# Altium PCB V11_Board.PcbDoc (part 2 of 2)
Units mil, origin at the board's own origin, x right, y up, seen from the top; angles counter-clockwise.
Board outline 6000 x 4000 mil, 2 copper layers (Top Layer, Bottom Layer); 168 components, 105 nets, 506 pads, 0 vias.
Unrouted connection lines stored in the file: 378.
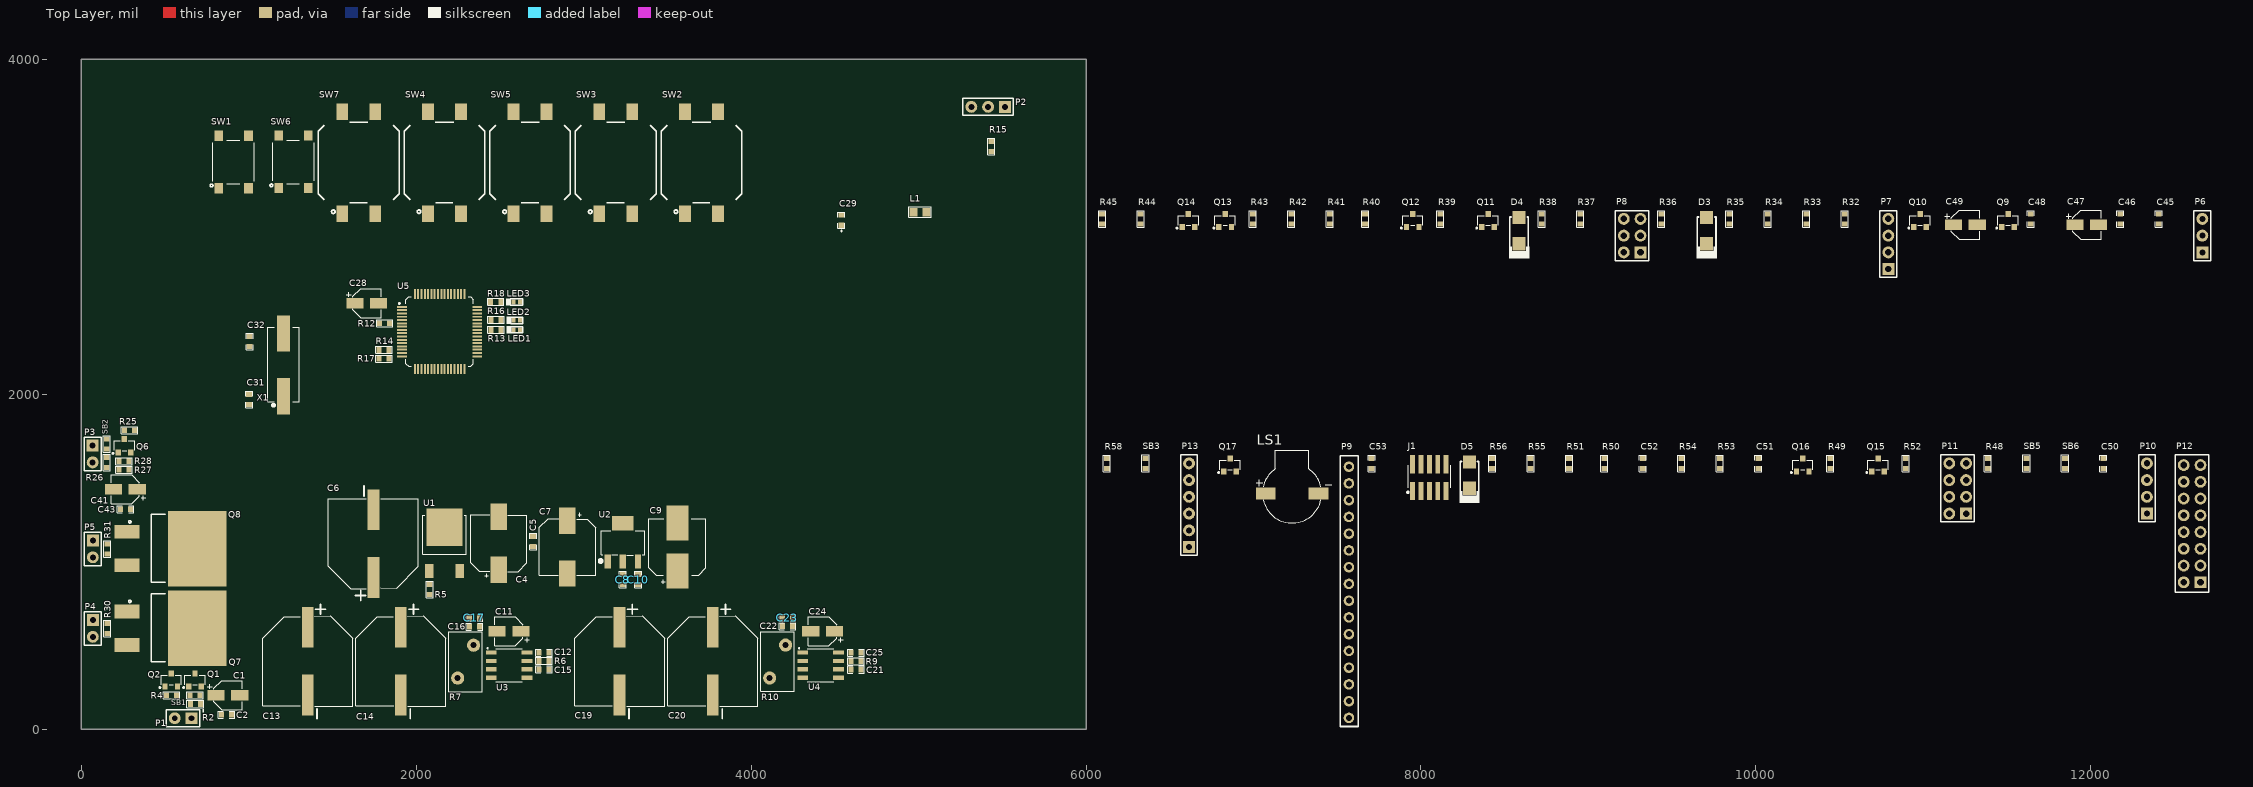
[diagram p0: Top Layer view]

## Part data (continued)
Q2 Q5 Q9 Q10 Q12 Q13 Q14 Q15 Q17: "TRANS NPN 160V 0.6A SOT-23", Case/Package=SOT-23-3, Collector Base Voltage (VCBO)=180V, Collector Emitter Breakdown Voltage=160V, Collector Emitter Saturation Voltage=150mV, Collector-emitter Voltage-Max=200mV, Current Rating=600mA, Emitter Base Voltage (VEBO)=6V, MANUFACTURER="ON Semiconductor", Manufacturer Part Number=MMBT5551LT1G, Max Operating Temperature=150°C, Max Power Dissipation=225mW, Min Operating Temperature=-55°C, Package Quantity=1, Power Dissipation=300mW, Supplier Part Number 1=MMBT5551LT1GOSDKR-ND, Category=BJTs, Collector Emitter Voltage (VCEO)=160V, ComponentLink1Description=https://datasheet.ciiva.com/976/mmbt5550lt1-d-976512.pdf?src-supplier=Digi-Key, ComponentLink1URL=https://datasheet.ciiva.com/976/mmbt5550lt1-d-976512.pdf?src-supplier=Digi-Key, ComponentLink2Description=https://datasheet.ciiva.com/34303/2011387-34303825.pdf?src-supplier=Jameco, ComponentLink2URL=https://datasheet.ciiva.com/34303/2011387-34303825.pdf?src-supplier=Jameco, ComponentLink3Description=https://datasheet.ciiva.com/15139/getdatasheetpartid-92641-15139178.pdf?src-supplier=Verical, ComponentLink3URL=https://datasheet.ciiva.com/15139/getdatasheetpartid-92641-15139178.pdf?src-supplier=Verical, ComponentLink4Description=https://datasheet.ciiva.com/16984/0900766b8078eb1b-16984971.pdf?src-supplier=Allied+Electronics, ComponentLink4URL=https://datasheet.ciiva.com/16984/0900766b8078eb1b-16984971.pdf?src-supplier=Allied+Electronics, ComponentLink5Description=https://datasheet.ciiva.com/976/mmbt5550lt1-d-976513.pdf?src-supplier=Digi-Key, ComponentLink5URL=https://datasheet.ciiva.com/976/mmbt5550lt1-d-976513.pdf?src-supplier=Digi-Key, ComponentLink6Description=https://datasheet.ciiva.com/4722/mmbt5550lt1-d-111393-4722711.pdf?src-supplier=Mouser, ComponentLink6URL=https://datasheet.ciiva.com/4722/mmbt5550lt1-d-111393-4722711.pdf?src-supplier=Mouser, ComponentLink7Description=https://datasheet.ciiva.com/16478/mmbt5550lt1-d-16478568.pdf?src-supplier=Avnet+Asia, ComponentLink7URL=https://datasheet.ciiva.com/16478/mmbt5550lt1-d-16478568.pdf?src-supplier=Avnet+Asia, ComponentLink8Description=https://datasheet.ciiva.com/7972/mmbt5550lt1-d-7972073.pdf?src-supplier=Element14, ComponentLink8URL=https://datasheet.ciiva.com/7972/mmbt5550lt1-d-7972073.pdf?src-supplier=Element14, ComponentLink9Description=https://datasheet.ciiva.com/25997/mmbt5550lt1-d-25997449.pdf?src-supplier=Avnet+Europe, ComponentLink9URL=https://datasheet.ciiva.com/25997/mmbt5550lt1-d-25997449.pdf?src-supplier=Avnet+Europe, ComponentLink10Description=https://datasheet.ciiva.com/7972/mmbt5550lt1-d-7972075.pdf?src-supplier=Element14, ComponentLink10URL=https://datasheet.ciiva.com/7972/mmbt5550lt1-d-7972075.pdf?src-supplier=Element14, ComponentLink11Description=https://datasheet.ciiva.com/11197/mmbt5550lt1-d-11197404.pdf?src-supplier=Avnet, ComponentLink11URL=https://datasheet.ciiva.com/11197/mmbt5550lt1-d-11197404.pdf?src-supplier=Avnet, ComponentLink12Description=https://datasheet.ciiva.com/976/mmbt5550lt1-d-976511.pdf?src-supplier=Digi-Key, ComponentLink12URL=https://datasheet.ciiva.com/976/mmbt5550lt1-d-976511.pdf?src-supplier=Digi-Key, ComponentLink13Description=https://datasheet.ciiva.com/16342/mmbt5550lt1-d-16342687.pdf?src-supplier=Future+Electronics, ComponentLink13URL=https://datasheet.ciiva.com/16342/mmbt5550lt1-d-16342687.pdf?src-supplier=Future+Electronics, Contact Plating=Tin,Matte, Element Configuration=Single, Height=0.94mm, hFE Min=80, Lead Free="Lead Free", Length=2.9mm, Max Breakdown Voltage=160V, Max Collector Current=600mA, Number of Elements=1, Number of Pins=3, Packaging="Tape and Reel", Polarity=NPN, Pricing 1="1=0.22000, 10=0.17700, 100=0.09370, 500=0.06162, 1000=0.04190 (USD)", Radiation Hardening=No, REACH SVHC="No SVHC", RoHS=Yes, RoHS Compliant=Yes, Series=-, Supplier 1=Digi-Key, Voltage Rating (DC)=160V, Weight=0.01lb, Width=1.3mm
Q3 Q6 Q16: "MOSFET N-CH 20V 4.2A SOT23", Case/Package=SOT-23, Continuous Drain Current (ID)=4.2A, Drain to Source Breakdown Voltage=20V, Drain to Source Resistance=45mR, Gate to Source Voltage (Vgs)=12V, Input Capacitance=740pF, MANUFACTURER="International Rectifier", Max Operating Temperature=150°C, Max Power Dissipation=1.25W, Min Operating Temperature=-55°C, Package Quantity=3000, Supplier Part Number 1=11X6741, Threshold Voltage=1.2V, Category=MOSFETs, ComponentLink1Description=https://datasheet.ciiva.com/36526/1563649-36526014.pdf?src-supplier=Jameco, ComponentLink1URL=https://datasheet.ciiva.com/36526/1563649-36526014.pdf?src-supplier=Jameco, ComponentLink2Description=https://datasheet.ciiva.com/16425/irlml2502pbf-16425943.pdf?src-supplier=Future+Electronics, ComponentLink2URL=https://datasheet.ciiva.com/16425/irlml2502pbf-16425943.pdf?src-supplier=Future+Electronics, ComponentLink3Description=https://datasheet.ciiva.com/6156/irlml2502-6156070.pdf?src-supplier=Farnell, ComponentLink3URL=https://datasheet.ciiva.com/6156/irlml2502-6156070.pdf?src-supplier=Farnell, ComponentLink4Description=https://datasheet.ciiva.com/7935/irlml2502-7935685.pdf?src-supplier=Element14, ComponentLink4URL=https://datasheet.ciiva.com/7935/irlml2502-7935685.pdf?src-supplier=Element14, Current Rating=4.2A, Drain to Source Voltage (Vdss)=20V, Drain-source On Resistance-Max=45mR, Dual Supply Voltage=20V, Element Configuration=Single, Fall Time=26ns, Height=1.02mm, Lead Free="Lead Free", Length=2.8mm, Manufacturer Part Number=IRLML2502TRPBF, Mount="Surface Mount", Nominal Vgs=1.2V, Number of Elements=1, Number of Pins=3, On-State Resistance=45mR, Packaging="Tape and Reel", Power Dissipation=1.25W, Radiation Hardening=No, Rds On Max=45mR, REACH SVHC="No SVHC", Rise Time=10ns, RoHS=Yes, Supplier 1=Newark, Termination=SMD/SMT, Turn-Off Delay Time=54ns, Turn-On Delay Time=7.5ns, Voltage Rating (DC)=20V, Width=1.4mm
Q7 Q8: "MOSFET N-CH 55V 110A D2PAK", Case/Package=D2PAK, Continuous Drain Current (ID)=110A, Drain to Source Breakdown Voltage=55V, Drain to Source Resistance=8mR, Gate to Source Voltage (Vgs)=20V, Input Capacitance=3.247nF, MANUFACTURER=Infineon, Max Operating Temperature=175°C, Max Power Dissipation=200W, Min Operating Temperature=-55°C, Supplier Part Number 1=IRF3205STRLPBFDKR-ND, Threshold Voltage=4V, Category=MOSFETs, ComponentLink1Description=http://www.farnell.com/datasheets/1884183.pdf?src-supplier=Element14, ComponentLink1URL=http://www.farnell.com/datasheets/1884183.pdf?src-supplier=Element14, Drain to Source Voltage (Vdss)=55V, Halogen Free="Halogen Free", Height=0.19inch, Lead Free="Contains Lead", Length=0.42inch, Manufacturer Part Number=IRF3205STRLPBF, Max Dual Supply Voltage=55V, Mount="Surface Mount", Number of Pins=3, Packaging="Cut Tape", Power Dissipation=200W, Pricing 1="1=1.87000, 10=1.67900, 100=1.34960 (USD)", Rds On Max=8mR, REACH SVHC="No SVHC", RoHS=Yes, Supplier 1=Digi-Key, Turn-Off Delay Time=50ns, Turn-On Delay Time=14ns, Width=0.38inch
R1 R3 R25 R27 R29 R39 R43 R55 R56: library part RC0603FR-071KL, "RES SMD 1K OHM 1% 1/10W 0603", Case Code (Imperial)=0603, Case Code (Metric)=1608, MANUFACTURER=Yageo, Max Operating Temperature=155°C, Min Operating Temperature=-55°C, Power Rating=100mW, Resistance=1kR, Supplier Part Number 1=311-1.00KHRDKR-ND, Temperature Coefficient=100ppm/°C, Tolerance=1%, Voltage Rating=50V, Case/Package=0603, ComponentLink1Description=https://www.verical.com/server-webapp/html/getDatasheet?partID=409289&src-supplier=Verical, ComponentLink1URL=https://www.verical.com/server-webapp/html/getDatasheet?partID=409289&src-supplier=Verical, ComponentLink2Description=http://documents.rs-components.com/techlib://itc_doclist_GB.htm?stockno=5048928&src-supplier=RSComponents, ComponentLink2URL=http://documents.rs-components.com/techlib://itc_doclist_GB.htm?stockno=5048928&src-supplier=RSComponents, ComponentLink3Description=http://www.yageo.com/documents/recent/PYu-RC0603_51_RoHS_L_4.pdf?src-supplier=Avnet+Europe, ComponentLink3URL=http://www.yageo.com/documents/recent/PYu-RC0603_51_RoHS_L_4.pdf?src-supplier=Avnet+Europe, ComponentLink4Description=http://www.farnell.com/datasheets/2167052.pdf?src-supplier=Element14, ComponentLink4URL=http://www.farnell.com/datasheets/2167052.pdf?src-supplier=Element14, ComponentLink5Description=http://www.farnell.com/datasheets/1868787.pdf?src-supplier=Element14, ComponentLink5URL=http://www.farnell.com/datasheets/1868787.pdf?src-supplier=Element14, ComponentLink6Description=http://www.yageo.com/documents/recent/PYu-RC_Group_51_RoHS_L_2.pdf?src-supplier=Avnet, ComponentLink6URL=http://www.yageo.com/documents/recent/PYu-RC_Group_51_RoHS_L_2.pdf?src-supplier=Avnet, ComponentLink7Description=https://www.verical.com/server-webapp/html/getDatasheet?partID=404327&src-supplier=Verical, ComponentLink7URL=https://www.verical.com/server-webapp/html/getDatasheet?partID=404327&src-supplier=Verical, ComponentLink8Description=http://www.farnell.com/datasheets/443971.pdf?src-supplier=Element14, ComponentLink8URL=http://www.farnell.com/datasheets/443971.pdf?src-supplier=Element14, Composition="Thick Film", Contact Plating=Tin,Matte, Depth=0.8mm, Height=0.45mm, Lead Free="Lead Free", Length=1.6mm, Manufacturer Part Number=RC0603FR-071KL, Military Standard=Not, Packaging="Tape and Reel", Pricing 1="1=0.1, 10=0.023, 100=0.0094, 1000=0.0042, 2500=0.0037 (USD)", Radiation Hardening=No, REACH SVHC="No SVHC", Stock 1=21472395, Supplier 1=Digi-Key, Termination=SMD/SMT
R2 R4 R26 R28 R32 R34 R41 R42 R48 R49 R51: library part AC0603JR-0710KL, "RES SMD 10K OHM 5% 1/10W 0603", Case Code (Imperial)=0603, Case Code (Metric)=1608, MANUFACTURER=Yageo, Max Operating Temperature=155°C, Max Power Dissipation=100mW, Min Operating Temperature=-55°C, Package Quantity=1, Resistance=10kR, Resistor Type="Thick Film", Supplier Part Number 1=1029044, Temperature Coefficient=100ppm/°C, Tolerance=5%, Voltage Rating=50V, Case/Package=0603, Category="Chip SMD Resistors", ComponentLink1Description=https://datasheet.ciiva.com/5562/pyu-ac-51-rohs-l-2-5562553.pdf?src-supplier=Mouser, ComponentLink1URL=https://datasheet.ciiva.com/5562/pyu-ac-51-rohs-l-2-5562553.pdf?src-supplier=Mouser, Construction=Rectangular, Depth=0.8mm, Features="Moisture Resistant,Automotive AEC-Q200,Anti-Sulfur", Height=0.022inch, Lead Free="Lead Free", Length=0.063inch, Manufacturer Part Number=AC0603JR-0710KL, Military Standard=Not, Number of Terminations=2, Packaging="Tape and Reel", Power Rating=100mW, Pricing 1="5000=0.00540 (USD)", RoHS=Yes, RoHS Compliant=Yes, Series=AC, Size Code=0603, Stock 1=1533000, Supplier 1="Future Electronics", Termination=SMD/SMT, Width=0.031inch
R5: library part RC0603FR-0733RL, "RES SMD 0603 33 Ohm 1% 1/10W", Case Code (Imperial)=0603, Case Code (Metric)=1608, MANUFACTURER=Yageo, Max Operating Temperature=155°C, Max Power Dissipation=100mW, Min Operating Temperature=-55°C, Package Quantity=1, Resistance Tolerance=1%, Resistor Type="Thick Film", Supplier Part Number 1=311-33.0HRCT-ND, Temperature Coefficient=100ppm/°C, Voltage Rating=75V, Voltage Rating (DC)=50V, Case/Package=0603, Category="Chip SMD Resistors", ComponentLink1Description=https://datasheet.ciiva.com/11808/0900766b80f96399-11808741.pdf?src-supplier=RSComponents, ComponentLink1URL=https://datasheet.ciiva.com/11808/0900766b80f96399-11808741.pdf?src-supplier=RSComponents, ComponentLink2Description=https://datasheet.ciiva.com/2453/pyu-r-int-thick-7-2453952.pdf?src-supplier=Digi-Key, ComponentLink2URL=https://datasheet.ciiva.com/2453/pyu-r-int-thick-7-2453952.pdf?src-supplier=Digi-Key, ComponentLink3Description=https://datasheet.ciiva.com/2453/pyu-r-int-thick-7-2453953.pdf?src-supplier=Digi-Key, ComponentLink3URL=https://datasheet.ciiva.com/2453/pyu-r-int-thick-7-2453953.pdf?src-supplier=Digi-Key, ComponentLink4Description=https://datasheet.ciiva.com/2453/pyu-r-int-thick-7-2453954.pdf?src-supplier=Digi-Key, ComponentLink4URL=https://datasheet.ciiva.com/2453/pyu-r-int-thick-7-2453954.pdf?src-supplier=Digi-Key, ComponentLink5Description=https://datasheet.ciiva.com/7660/38590-7660792.pdf?src-supplier=Element14, ComponentLink5URL=https://datasheet.ciiva.com/7660/38590-7660792.pdf?src-supplier=Element14, ComponentLink6Description=https://datasheet.ciiva.com/15189/getdatasheetpartid-326673-15189708.pdf?src-supplier=Verical, ComponentLink6URL=https://datasheet.ciiva.com/15189/getdatasheetpartid-326673-15189708.pdf?src-supplier=Verical, ComponentLink7Description=https://datasheet.ciiva.com/7746/443971-7746334.pdf?src-supplier=Element14, ComponentLink7URL=https://datasheet.ciiva.com/7746/443971-7746334.pdf?src-supplier=Element14, ComponentLink8Description=https://datasheet.ciiva.com/7746/443971-7746335.pdf?src-supplier=Element14, ComponentLink8URL=https://datasheet.ciiva.com/7746/443971-7746335.pdf?src-supplier=Element14, ComponentLink9Description=https://datasheet.ciiva.com/46395/443971-46395007.pdf?src-supplier=Element14, ComponentLink9URL=https://datasheet.ciiva.com/46395/443971-46395007.pdf?src-supplier=Element14, Construction=Rectangular, Depth=0.8mm, Features="Moisture Resistant", Height=0.45mm, Lead Free="Lead Free", Lead Pitch=0.3mm, Length=1.6mm, Manufacturer Part Number=RC0603FR-0733RL, Military Standard=Not, Number of Pins=2, Number of Terminations=2, Packaging="Tape and Reel", Power Rating=100mW, Pricing 1="1=0.10000, 10=0.02400, 100=0.00970, 1000=0.00436, 2500=0.00378 (USD)", REACH SVHC="No SVHC", Resistance=33R, RoHS=Yes, RoHS Compliant=Yes, Series=RC, Size Code=0603, Stock 1=41, Supplier 1=Digi-Key, Technology="THICK FILM", Termination=SMD/SMT, Tolerance=1%, Weight=7.1E-05oz, Width=0.8mm
R6 R9 R15 R19 R20 R21 R22 R23 R50: library part RC0603FR-072K2L, "RES SMD 2.2K OHM 1% 1/10W 0603", Case/Package=0603, MANUFACTURER="Yageo Phycomp", Max Operating Temperature=155°C, Min Operating Temperature=-55°C, Power Rating=100mW, Resistance=2.2kR, Supplier Part Number 1=311-2.20KHRCT-ND, Temperature Coefficient=100ppm/°C, Tolerance=1%, Voltage Rating (DC)=50V, Depth=0.8mm, Height=0.45mm, Lead Free="Lead Free", Length=1.6mm, Manufacturer Part Number=RC0603FR-072K2L, Mount="Surface Mount", Number of Pins=2, Packaging="Cut Tape", Pricing 1="1=0.1, 10=0.023, 100=0.0094, 1000=0.00421, 2500=0.00366 (USD)", REACH SVHC="No SVHC", Stock 1=10587920, Supplier 1=Digi-Key, Width=800um
R7 R10: "VARISTOR 22V 250A DISC 7MM", Capacitance=2.3nF, Case/Package=Radial, Clamping Current=2.5A, Clamping Voltage=43V, MANUFACTURER=Bourns, Max Operating Temperature=85°C, Max Surge Current=250A, Max Varistor Voltage=24V, Max Voltage Rating (AC)=14V, Max Voltage Rating (DC)=18V, Min Operating Temperature=-40°C, Min Varistor Voltage=20V, Package Quantity=2000, Supplier Part Number 1=MOV-07D220K-ND, Tolerance=10%, Varistor Voltage=22V, Category=Varistors, ComponentLink1Description=https://datasheet.ciiva.com/30093/mov07d-30093751.pdf?src-supplier=Onlinecomponents.com, ComponentLink1URL=https://datasheet.ciiva.com/30093/mov07d-30093751.pdf?src-supplier=Onlinecomponents.com, ComponentLink2Description=https://datasheet.ciiva.com/369/mov07d-369225.pdf?src-supplier=Digi-Key, ComponentLink2URL=https://datasheet.ciiva.com/369/mov07d-369225.pdf?src-supplier=Digi-Key, ComponentLink3Description=https://datasheet.ciiva.com/3026/mov07d-3026223.pdf?src-supplier=Avnet, ComponentLink3URL=https://datasheet.ciiva.com/3026/mov07d-3026223.pdf?src-supplier=Avnet, Diameter=7mm, Energy=1.1J, Lead Pitch=5mm, Lead/Base Style=Radial, Manufacturer Part Number=MOV-07D220K, Mount="Through Hole,Radial", Number of Circuits=1, Packaging=Bulk, Pricing 1="1=0.43000, 10=0.30800, 25=0.23920, 100=0.18130, 250=0.12824, 500=0.10260, 1000=0.07866, 2500=0.06840, 5000=0.06156 (USD)", Radiation Hardening=No, RoHS=Yes, RoHS Compliant=Yes, Series=-, Stock 1=292, Supplier 1=Digi-Key, Voltage Rating (DC)=24V, Width=6.8mm
R8 R11: library part AC0603JR-07470KL, "RES SMD 470K OHM 5% 1/10W 0603", Case Code (Imperial)=0603, Case Code (Metric)=1608, MANUFACTURER=Yageo, Max Operating Temperature=155°C, Max Power Dissipation=100mW, Min Operating Temperature=-55°C, Resistance=470kR, Resistor Type="Thick Film", Supplier Part Number 1=YAG3672DKR-ND, Temperature Coefficient=100ppm/°C, Tolerance=5%, Voltage Rating=50V, Case/Package=0603, ComponentLink1Description=https://datasheet.ciiva.com/11820/0900766b80808d64-11820639.pdf?src-supplier=RSComponents, ComponentLink1URL=https://datasheet.ciiva.com/11820/0900766b80808d64-11820639.pdf?src-supplier=RSComponents, ComponentLink2Description=https://datasheet.ciiva.com/2487/rr-data-sheet-2487286.pdf?src-supplier=Digi-Key, ComponentLink2URL=https://datasheet.ciiva.com/2487/rr-data-sheet-2487286.pdf?src-supplier=Digi-Key, ComponentLink3Description=https://datasheet.ciiva.com/7984/87330-7984374.pdf?src-supplier=Element14, ComponentLink3URL=https://datasheet.ciiva.com/7984/87330-7984374.pdf?src-supplier=Element14, ComponentLink4Description=https://datasheet.ciiva.com/2487/rr-data-sheet-2487287.pdf?src-supplier=Digi-Key, ComponentLink4URL=https://datasheet.ciiva.com/2487/rr-data-sheet-2487287.pdf?src-supplier=Digi-Key, ComponentLink5Description=https://datasheet.ciiva.com/2487/rr-data-sheet-2487288.pdf?src-supplier=Digi-Key, ComponentLink5URL=https://datasheet.ciiva.com/2487/rr-data-sheet-2487288.pdf?src-supplier=Digi-Key, ComponentLink6Description=https://datasheet.ciiva.com/5759/87330-5759049.pdf?src-supplier=Farnell, ComponentLink6URL=https://datasheet.ciiva.com/5759/87330-5759049.pdf?src-supplier=Farnell, ComponentLink7Description=http://www.mouser.com/ds/2/447/yageodocoutput-1111992.pdf?src-supplier=Mouser, ComponentLink7URL=http://www.mouser.com/ds/2/447/yageodocoutput-1111992.pdf?src-supplier=Mouser, Features="Moisture Resistant,Automotive AEC-Q200", Height=0.022inch, Length=0.063inch, Manufacturer Part Number=AC0603JR-07470KL, Number of Terminations=2, Packaging="Tape and Reel", Power Rating=100mW, Pricing 1="1=0.1, 10=0.024, 100=0.0097, 1000=0.0044, 2500=0.0038 (USD)", RoHS Compliant=Yes, Series=AC, Stock 1=71, Supplier 1=Digi-Key, Termination=SMD/SMT, Weight=7.1E-05oz, Width=0.8mm
R12: library part RC0603JR-07390RL, "RES SMD 390 OHM 5% 1/10W 0603", Case Code (Imperial)=0603, Case Code (Metric)=1608, MANUFACTURER=Yageo, Max Operating Temperature=155°C, Max Power Dissipation=100mW, Min Operating Temperature=-55°C, Package Quantity=1, Supplier Part Number 1=311-390GRCT-ND, Temperature Coefficient=100ppm/°C, Tolerance=5%, Voltage Rating=50V, Working Voltage=75V, Case/Package=0603, ComponentLink1Description=http://www.yageo.com.tw/exep/pages/download/literatures/PYu-R_INT-thick_7.pdf?src-supplier=Digi-Key, ComponentLink1URL=http://www.yageo.com.tw/exep/pages/download/literatures/PYu-R_INT-thick_7.pdf?src-supplier=Digi-Key, ComponentLink2Description=http://www.yageo.com/documents/recent/PYu-RC_Group_51_RoHS_L_10.pdf?src-supplier=Digi-Key, ComponentLink2URL=http://www.yageo.com/documents/recent/PYu-RC_Group_51_RoHS_L_10.pdf?src-supplier=Digi-Key, ComponentLink3Description=http://www.yageo.com/documents/recent/PYu-RC_Group_51_RoHS_L_9.pdf?src-supplier=Digi-Key, ComponentLink3URL=http://www.yageo.com/documents/recent/PYu-RC_Group_51_RoHS_L_9.pdf?src-supplier=Digi-Key, ComponentLink4Description=http://www.farnell.com/datasheets/443971.pdf?src-supplier=Element14, ComponentLink4URL=http://www.farnell.com/datasheets/443971.pdf?src-supplier=Element14, Composition="Thick Film", Depth=0.8mm, Features="Moisture Resistant", Height=0.022inch, Lead Free="Lead Free", Length=1.6mm, Manufacturer Part Number=RC0603JR-07390RL, Military Standard=Not, Number of Pins=2, Number of Terminations=2, Packaging="Tape and Reel", Power Rating=100mW, Pricing 1="1=0.1, 10=0.02, 100=0.0081, 1000=0.00362, 2500=0.00314 (USD)", REACH SVHC="No SVHC", Resistance=390R, Stock 1=1598874, Supplier 1=Digi-Key, Termination=SMD/SMT, Voltage Rating (DC)=50V, Width=0.8mm
R13 R16 R18: library part RC0603FR-07680RL, "RES SMD 680 OHM 1% 1/10W 0603", Case Code (Imperial)=0603, Case Code (Metric)=1608, MANUFACTURER=Yageo, Max Operating Temperature=155°C, Max Power Dissipation=100mW, Min Operating Temperature=-55°C, Package Quantity=1, Supplier Part Number 1=311-680HRCT-ND, Temperature Coefficient=100ppm/°C, Tolerance=1%, Voltage Rating=50V, Case/Package=0603, ComponentLink1Description=http://www.farnell.com/datasheets/1868787.pdf?src-supplier=Element14, ComponentLink1URL=http://www.farnell.com/datasheets/1868787.pdf?src-supplier=Element14, ComponentLink2Description=http://documents.rs-components.com/techlib://itc_doclist_GB.htm?stockno=5048221&src-supplier=RSComponents, ComponentLink2URL=http://documents.rs-components.com/techlib://itc_doclist_GB.htm?stockno=5048221&src-supplier=RSComponents, ComponentLink3Description=http://www.farnell.com/datasheets/443971.pdf?src-supplier=Element14, ComponentLink3URL=http://www.farnell.com/datasheets/443971.pdf?src-supplier=Element14, ComponentLink4Description=http://www.yageo.com/documents/recent/PYu-RC_Group_51_RoHS_L_10.pdf?src-supplier=Digi-Key, ComponentLink4URL=http://www.yageo.com/documents/recent/PYu-RC_Group_51_RoHS_L_10.pdf?src-supplier=Digi-Key, Composition="Thick Film", Depth=0.8mm, Features="Moisture Resistant", Height=0.022inch, Lead Free="Lead Free", Length=1.6mm, Manufacturer Part Number=RC0603FR-07680RL, Military Standard=Not, Number of Pins=2, Number of Terminations=2, Packaging="Tape and Reel", Power Rating=100mW, Pricing 1="1=0.1, 10=0.024, 100=0.0097, 1000=0.00437, 2500=0.00379 (USD)", REACH SVHC="No SVHC", Resistance=680R, Stock 1=4278227, Supplier 1=Digi-Key, Termination=SMD/SMT, Voltage Rating (DC)=50V, Width=0.031inch
R14: library part CRCW06036K80JNEA, "RES SMD 6.8K OHM 5% 1/10W 0603", Case Code (Imperial)=0603, Case Code (Metric)=1608, MANUFACTURER="Vishay Dale", Max Operating Temperature=155°C, Max Power Dissipation=100mW, Min Operating Temperature=-55°C, Package Quantity=1, Resistance=6.8kR, Resistance Tolerance=5%, Resistor Type="Thick Film", Supplier Part Number 1=541-6.8KGCT-ND, Temperature Coefficient=200ppm/°C, Voltage Rating=75V, Case/Package=0603, Category="Chip SMD Resistors", ComponentLink1Description=https://datasheet.ciiva.com/2493/dcrcwe3-2493715.pdf?src-supplier=Digi-Key, ComponentLink1URL=https://datasheet.ciiva.com/2493/dcrcwe3-2493715.pdf?src-supplier=Digi-Key, ComponentLink2Description=https://datasheet.ciiva.com/2493/dcrcwe3-2493716.pdf?src-supplier=Digi-Key, ComponentLink2URL=https://datasheet.ciiva.com/2493/dcrcwe3-2493716.pdf?src-supplier=Digi-Key, ComponentLink3Description=https://datasheet.ciiva.com/2493/dcrcwe3-2493717.pdf?src-supplier=Digi-Key, ComponentLink3URL=https://datasheet.ciiva.com/2493/dcrcwe3-2493717.pdf?src-supplier=Digi-Key, ComponentLink4Description=https://datasheet.ciiva.com/28542/1747939-28542618.pdf?src-supplier=Element14, ComponentLink4URL=https://datasheet.ciiva.com/28542/1747939-28542618.pdf?src-supplier=Element14, ComponentLink5Description=https://datasheet.ciiva.com/3257/dcrcwe3-3257854.pdf?src-supplier=Avnet, ComponentLink5URL=https://datasheet.ciiva.com/3257/dcrcwe3-3257854.pdf?src-supplier=Avnet, Construction=Rectangular, Contact Plating=Tin, Depth=0.85mm, Features="Automotive AEC-Q200", Height=0.45mm, Lead Free="Lead Free", Length=1.55mm, Manufacturer Part Number=CRCW06036K80JNEA, Military Standard=Not, Number of Terminations=2, Packaging="Tape and Reel", Power Rating=100mW, Pricing 1="1=0.10000, 10=0.03300, 100=0.01360, 1000=0.00610, 2500=0.00529 (USD)", Radiation Hardening=No, REACH SVHC=Unknown, RoHS=Yes, RoHS Compliant=Yes, Series=CRCW, Size Code=0603, Stock 1=38850, Supplier 1=Digi-Key, Technology="THICK FILM", Termination=SMD/SMT, Tolerance=5%, Voltage Rating (DC)=75V, Weight=7.1E-05oz, Width=0.85mm
R17: library part RC0603FR-073K3L, "RES SMD 3.3K OHM 1% 1/10W 0603", Case/Package=0603, MANUFACTURER="Yageo Phycomp", Max Operating Temperature=155°C, Min Operating Temperature=-55°C, Power Rating=100mW, Resistance=3.3kR, Supplier Part Number 1=311-3.30KHRCT-ND, Temperature Coefficient=100ppm/°C, Tolerance=1%, Voltage Rating (DC)=50V, Depth=0.8mm, Height=0.45mm, Lead Free="Lead Free", Length=1.6mm, Manufacturer Part Number=RC0603FR-073K3L, Mount="Surface Mount", Number of Pins=2, Packaging="Cut Tape", Pricing 1="1=0.1, 10=0.024, 100=0.0097, 1000=0.00437, 2500=0.00379 (USD)", REACH SVHC="No SVHC", Stock 1=6863000, Supplier 1=Digi-Key, Width=800um
R24 R33 R36: library part RC0603JR-07330RL, "RES SMD 330 OHM 5% 1/10W 0603"
R30 R31: library part RC0603FR-0747RL, "RES SMD 47OHM 0.1W 0603", Case Code (Imperial)=0603, Case Code (Metric)=1608, MANUFACTURER=Yageo, Max Operating Temperature=155°C, Max Power Dissipation=100mW, Min Operating Temperature=-55°C, Package Quantity=1, Resistance Tolerance=1%, Resistor Type="Thick Film", Supplier Part Number 1=311-47.0HRCT-ND, Temperature Coefficient=100ppm/°C, Voltage Rating=75V, Voltage Rating (DC)=50V, Case/Package=0603, Category="Chip SMD Resistors", ComponentLink1Description=https://datasheet.ciiva.com/2453/pyu-r-int-thick-7-2453922.pdf?src-supplier=Digi-Key, ComponentLink1URL=https://datasheet.ciiva.com/2453/pyu-r-int-thick-7-2453922.pdf?src-supplier=Digi-Key, ComponentLink2Description=https://datasheet.ciiva.com/2453/pyu-r-int-thick-7-2453923.pdf?src-supplier=Digi-Key, ComponentLink2URL=https://datasheet.ciiva.com/2453/pyu-r-int-thick-7-2453923.pdf?src-supplier=Digi-Key, ComponentLink3Description=https://datasheet.ciiva.com/2453/pyu-r-int-thick-7-2453924.pdf?src-supplier=Digi-Key, ComponentLink3URL=https://datasheet.ciiva.com/2453/pyu-r-int-thick-7-2453924.pdf?src-supplier=Digi-Key, ComponentLink4Description=https://datasheet.ciiva.com/7746/443971-7746363.pdf?src-supplier=Element14, ComponentLink4URL=https://datasheet.ciiva.com/7746/443971-7746363.pdf?src-supplier=Element14, ComponentLink5Description=https://datasheet.ciiva.com/7746/443971-7746364.pdf?src-supplier=Element14, ComponentLink5URL=https://datasheet.ciiva.com/7746/443971-7746364.pdf?src-supplier=Element14, ComponentLink6Description=https://datasheet.ciiva.com/46440/1868787-46440908.pdf?src-supplier=Element14, ComponentLink6URL=https://datasheet.ciiva.com/46440/1868787-46440908.pdf?src-supplier=Element14, Construction=Rectangular, Depth=0.8mm, Features="Moisture Resistant", Height=0.022inch, Lead Free="Lead Free", Length=1.6mm, Manufacturer Part Number=RC0603FR-0747RL, Military Standard=Not, Number of Pins=2, Number of Terminations=2, Packaging="Tape and Reel", Power Rating=100mW, Pricing 1="1=0.10000, 10=0.02400, 100=0.00970, 1000=0.00436, 2500=0.00378 (USD)", REACH SVHC=Unknown, Resistance=47R, RoHS=Yes, RoHS Compliant=Yes, Series=RC, Size Code=0603, Stock 1=596562, Supplier 1=Digi-Key, Termination=SMD/SMT, Tolerance=1%, Weight=7.1E-05oz, Width=0.8mm
R35 R40: library part RC0603FR-071K5L, "RES SMD 1.5K OHM 1% 1/10W 0603"
R37 R38 R52: library part RC0603FR-070RL, "RES SMD 0R, 1%, 0.1W, 0603", Case Code (Imperial)=0603, Case Code (Metric)=1608, Current Rating=1A, MANUFACTURER=Yageo, Max Operating Temperature=155°C, Max Power Dissipation=100mW, Min Operating Temperature=-55°C, Package Quantity=5000, Resistance=0mR, Resistor Type="Thick Film", Temperature Coefficient=200ppm/°C, Tolerance=1%, Voltage Rating=50V, Working Voltage=75V, Case/Package=0603, Category="Chip SMD Resistors", ComponentLink1Description=https://datasheet.ciiva.com/11808/0900766b80f96399-11808172.pdf?src-supplier=RSComponents, ComponentLink1URL=https://datasheet.ciiva.com/11808/0900766b80f96399-11808172.pdf?src-supplier=RSComponents, ComponentLink2Description=https://datasheet.ciiva.com/5558/rc0603-272842-5558341.pdf?src-supplier=Mouser, ComponentLink2URL=https://datasheet.ciiva.com/5558/rc0603-272842-5558341.pdf?src-supplier=Mouser, ComponentLink3Description=https://datasheet.ciiva.com/46382/443971-46382072.pdf?src-supplier=Element14, ComponentLink3URL=https://datasheet.ciiva.com/46382/443971-46382072.pdf?src-supplier=Element14, ComponentLink4Description=https://datasheet.ciiva.com/29721/pyu-r-int-thick-7-29721178.pdf?src-supplier=Digi-Key, ComponentLink4URL=https://datasheet.ciiva.com/29721/pyu-r-int-thick-7-29721178.pdf?src-supplier=Digi-Key, ComponentLink5Description=https://datasheet.ciiva.com/5684/443971-5684699.pdf?src-supplier=Farnell, ComponentLink5URL=https://datasheet.ciiva.com/5684/443971-5684699.pdf?src-supplier=Farnell, ComponentLink6Description=https://datasheet.ciiva.com/7983/443971-7983627.pdf?src-supplier=Element14, ComponentLink6URL=https://datasheet.ciiva.com/7983/443971-7983627.pdf?src-supplier=Element14, ComponentLink7Description=https://datasheet.ciiva.com/29721/pyu-rc0603-51-rohs-l-4-29721179.pdf?src-supplier=Digi-Key, ComponentLink7URL=https://datasheet.ciiva.com/29721/pyu-rc0603-51-rohs-l-4-29721179.pdf?src-supplier=Digi-Key, ComponentLink8Description=https://datasheet.ciiva.com/22643/1868787-22643388.pdf?src-supplier=Element14, ComponentLink8URL=https://datasheet.ciiva.com/22643/1868787-22643388.pdf?src-supplier=Element14, Contact Plating=Tin,Matte, Depth=0.8mm, Features="Moisture Resistant", Height=0.45mm, Lead Free="Lead Free", Length=1.6mm, Manufacturer Part Number=RC0603FR-070RL, Military Standard=Not, Number of Pins=2, Number of Terminations=2, Packaging="Tape and Reel", Power Rating=100mW, Pricing 1="5000=0.00320, 5000=0.00490, 50000=0.00450, 500000=0.00250, 2500000=0.00150 (USD)", Radiation Hardening=No, REACH SVHC="No SVHC", RoHS=Yes, Stock 1=1270000, Supplier 1="Arrow Electronics", Supplier Part Number 1=RC0603FR-070RL, Termination=SMD/SMT, Voltage Rating (DC)=50V, Width=0.031inch
R44 R45 R53 R54 R58: library part RC0603FR-074K7L, "RES SMD 4.7K OHM 1% 1/10W 0603", Case Code (Imperial)=0603, Case Code (Metric)=1608, MANUFACTURER=Yageo, Max Operating Temperature=155°C, Max Power Dissipation=100mW, Min Operating Temperature=-55°C, Resistance=4.7kR, Resistance Tolerance=1%, Resistor Type="Thick Film", Supplier Part Number 1=311-4.70KHRCT-ND, Temperature Coefficient=100ppm/°C, Voltage Rating=50V, Case/Package=0603, Category="Chip SMD Resistors", ComponentLink1Description=https://datasheet.ciiva.com/15189/getdatasheetpartid-422754-15189760.pdf?src-supplier=Verical, ComponentLink1URL=https://datasheet.ciiva.com/15189/getdatasheetpartid-422754-15189760.pdf?src-supplier=Verical, ComponentLink2Description=https://datasheet.ciiva.com/22747/443971-22747528.pdf?src-supplier=Element14, ComponentLink2URL=https://datasheet.ciiva.com/22747/443971-22747528.pdf?src-supplier=Element14, ComponentLink3Description=https://datasheet.ciiva.com/7660/38590-7660794.pdf?src-supplier=Element14, ComponentLink3URL=https://datasheet.ciiva.com/7660/38590-7660794.pdf?src-supplier=Element14, ComponentLink4Description=https://datasheet.ciiva.com/7746/1868787-7746365.pdf?src-supplier=Element14, ComponentLink4URL=https://datasheet.ciiva.com/7746/1868787-7746365.pdf?src-supplier=Element14, ComponentLink5Description=https://datasheet.ciiva.com/46440/1868787-46440909.pdf?src-supplier=Element14, ComponentLink5URL=https://datasheet.ciiva.com/46440/1868787-46440909.pdf?src-supplier=Element14, ComponentLink6Description=https://datasheet.ciiva.com/7746/1738695-7746366.pdf?src-supplier=Element14, ComponentLink6URL=https://datasheet.ciiva.com/7746/1738695-7746366.pdf?src-supplier=Element14, Construction=Rectangular, Depth=0.8mm, Features="Moisture Resistant", Height=0.45mm, Lead Free="Lead Free", Lead Pitch=0.3mm, Length=1.6mm, Manufacturer Part Number=RC0603FR-074K7L, Military Standard=Not, Number of Pins=2, Number of Terminations=2, Packaging="Tape and Reel", Power Rating=100mW, Pricing 1="1=0.10000, 10=0.02400, 100=0.00970, 1000=0.00436, 2500=0.00378 (USD)", REACH SVHC="No SVHC", RoHS=Yes, RoHS Compliant=Yes, Series=RC, Size Code=0603, Stock 1=1924316, Supplier 1=Digi-Key, Termination=SMD/SMT, Tolerance=1%, Voltage Rating (DC)=50V, Width=0.8mm
SB1 SB2 SB3 SB5 SB6: "Solder Bridge ON"
SW1 SW6: "SWITCH TACTILE SPST-NO 0.05A 12V", Case/Package=SMD/SMT, Color=Black, Contact Resistance=100mR, Current Rating=50mA, MANUFACTURER="ITT C&K", Max Operating Temperature=60°C, Max Voltage Rating (DC)=12V, Min Operating Temperature=-20°C, Operating Force=160gf, Package Quantity=1, Supplier Part Number 1=CKN9112CT-ND, Actuator Length=0.85mm, Actuator Material=Nylon,Polyamide,PA66, Actuator Type=Standard, Category="Tactile Switches", ComponentLink1Description=https://datasheet.ciiva.com/29903/getdatasheetpartid-786341-29903846.pdf?src-supplier=Verical, ComponentLink1URL=https://datasheet.ciiva.com/29903/getdatasheetpartid-786341-29903846.pdf?src-supplier=Verical, ComponentLink2Description=https://datasheet.ciiva.com/29931/getdatasheetpartid-764615-29931183.pdf?src-supplier=Verical, ComponentLink2URL=https://datasheet.ciiva.com/29931/getdatasheetpartid-764615-29931183.pdf?src-supplier=Verical, ComponentLink3Description=https://datasheet.ciiva.com/14920/pts645-14920733.pdf?src-supplier=Digi-Key, ComponentLink3URL=https://datasheet.ciiva.com/14920/pts645-14920733.pdf?src-supplier=Digi-Key, ComponentLink4Description=https://datasheet.ciiva.com/14920/pts645-14920734.pdf?src-supplier=Digi-Key, ComponentLink4URL=https://datasheet.ciiva.com/14920/pts645-14920734.pdf?src-supplier=Digi-Key, ComponentLink5Description=https://datasheet.ciiva.com/14920/pts645-14920735.pdf?src-supplier=Digi-Key, ComponentLink5URL=https://datasheet.ciiva.com/14920/pts645-14920735.pdf?src-supplier=Digi-Key, Contact Material=Silver, Contact Plating=Silver, Depth=9mm, Illumination Type=Non-Illuminated,Illuminated, Lead Free="Lead Free", Length=6mm, Manufacturer Part Number=PTS645SM43SMTR92LFS, Max Current Rating=50mA, Mechanical Life=100000Cycles, Mount="Surface Mount", Orientation=Straight, Packaging="Tape and Reel", Pricing 1="1=0.26000, 10=0.25100, 25=0.23840, 100=0.21580, 250=0.19676, 500=0.18288 (USD)", REACH SVHC="No SVHC", RoHS=Yes, RoHS Compliant=Yes, Series=PTS645, Size=6mm, Stock 1=1002899, Supplier 1=Digi-Key, Switch Function=Off-Mom, Termination="Gull Wing", Throw Configuration=SPST, Voltage Rating (DC)=12V
SW2 SW3 SW4 SW5 SW7: library part TL3300CF160Q, "SWITCH TACTILE SPST-NO 0.05A 12V", Case/Package=SMD/SMT, Contact Resistance=100mR, Current Rating=50mA, MANUFACTURER=E-Switch, Max Operating Temperature=70°C, Max Voltage Rating (DC)=12V, Min Operating Temperature=-25°C, Operating Force=160gf, Package Quantity=1, Supplier Part Number 1=612-TL3300CF160Q, Actuator Length=5mm, Actuator Type=Standard, ComponentLink1Description=http://www.e-switch.com/system/asset/product_line/data_sheet/157/TL3300.pdf?src-supplier=Digi-Key, ComponentLink1URL=http://www.e-switch.com/system/asset/product_line/data_sheet/157/TL3300.pdf?src-supplier=Digi-Key, ComponentLink2Description=http://spec_sheets.e-switch.com/specs/N301102.pdf?src-supplier=Digi-Key, ComponentLink2URL=http://spec_sheets.e-switch.com/specs/N301102.pdf?src-supplier=Digi-Key, Contact Plating=Silver, Electrical Life=200000Cycles, Illumination Type=Non-Illuminated, Lead Free="Lead Free", Manufacturer Part Number=TL3300CF160Q, Mechanical Life=200000Cycles, Mount="Surface Mount", Orientation=Straight, Packaging="Tape and Reel", Pricing 1="1=0.53, 10=0.513, 50=0.43, 100=0.393, 1000=0.293, 10000=0.274 (USD)", RoHS Compliant=Yes, Series=TL3300, Stock 1=1884, Supplier 1=Mouser, Switch Function=Off-Mom, Switch Travel=0.35mm, Termination="Gull Wing", Throw Configuration=SPST, Voltage Rating (DC)=12V
U1: "IC REG LINEAR 5V 500MA TO252-3", Case/Package=TO-252, Current Rating=500mA, Dropout Voltage=1.8V, MANUFACTURER="TI National Semiconductor", Max Input Voltage=35V, Max Operating Temperature=125°C, Min Input Voltage=7.2V, Min Operating Temperature=-40°C, Output Voltage=5V, Package Quantity=75, Power Supply Rejection Ratio (PSRR)=78dB, Quiescent Current=10mA, Supplier Part Number 1=LM78M05CDT-ND, Category="Voltage Regulators - Linear", ComponentLink1Description=https://datasheet.ciiva.com/26906/lm78m05cdt-26906263.pdf?src-supplier=IIIC, ComponentLink1URL=https://datasheet.ciiva.com/26906/lm78m05cdt-26906263.pdf?src-supplier=IIIC, ComponentLink2Description=https://datasheet.ciiva.com/6584/lm341-6584030.pdf?src-supplier=Digi-Key, ComponentLink2URL=https://datasheet.ciiva.com/6584/lm341-6584030.pdf?src-supplier=Digi-Key, Height=2.3mm, Lead Free="Contains Lead", Length=6.58mm, Manufacturer Part Number=LM78M05CDT, Max Output Current=500mA, Mount="Surface Mount", Number of Outputs=1, Number of Pins=3, Number of Regulators=1, Output Current=500mA, Output Type=Fixed, Packaging=Rail/Tube, Polarity=Positive, Pricing 1="1=2.68000, 10=2.40700, 25=2.27120, 100=1.93490, 250=1.81684, 500=1.58974, 1000=1.49975 (USD)", Radiation Hardening=No, RoHS=No, RoHS Compliant=No, Series=-, Stock 1=815, Supplier 1=Digi-Key, Width=6.1mm
U2: "IC REG LINEAR 3.3V 1A SOT223", Case/Package=SOT-223, Current Rating=1A, Dropout Voltage=1.2V, MANUFACTURER="Texas Instruments", Max Input Voltage=15V, Max Operating Temperature=125°C, Min Input Voltage=2.5V, Min Operating Temperature=0°C, Nominal Output Voltage=3.3V, Nominal Supply Current=5mA, Output Voltage Accuracy=1%, Package Quantity=1000, Quiescent Current=10mA, Accuracy=1%, Category="Voltage Regulators - Linear", ComponentLink1Description=https://datasheet.ciiva.com/3225/lms8117a-3225472.pdf?src-supplier=Avnet, ComponentLink1URL=https://datasheet.ciiva.com/3225/lms8117a-3225472.pdf?src-supplier=Avnet, ComponentLink2Description=https://datasheet.ciiva.com/2066/lms8117a-2066594.pdf?src-supplier=Digi-Key, ComponentLink2URL=https://datasheet.ciiva.com/2066/lms8117a-2066594.pdf?src-supplier=Digi-Key, ComponentLink3Description=https://datasheet.ciiva.com/2066/lms8117a-2066595.pdf?src-supplier=Digi-Key, ComponentLink3URL=https://datasheet.ciiva.com/2066/lms8117a-2066595.pdf?src-supplier=Digi-Key, ComponentLink4Description=https://datasheet.ciiva.com/2066/lms8117a-2066596.pdf?src-supplier=Digi-Key, ComponentLink4URL=https://datasheet.ciiva.com/2066/lms8117a-2066596.pdf?src-supplier=Digi-Key, ComponentLink5Description=https://datasheet.ciiva.com/3223/lms8117a-3223813.pdf?src-supplier=Avnet, ComponentLink5URL=https://datasheet.ciiva.com/3223/lms8117a-3223813.pdf?src-supplier=Avnet, ComponentLink6Description=https://datasheet.ciiva.com/25979/lms8117a-25979141.pdf?src-supplier=Avnet+Europe, ComponentLink6URL=https://datasheet.ciiva.com/25979/lms8117a-25979141.pdf?src-supplier=Avnet+Europe, ComponentLink7Description=https://datasheet.ciiva.com/46386/1558097-46386039.pdf?src-supplier=Element14, ComponentLink7URL=https://datasheet.ciiva.com/46386/1558097-46386039.pdf?src-supplier=Element14, ComponentLink8Description=https://datasheet.ciiva.com/8042/90386-8042363.pdf?src-supplier=Element14, ComponentLink8URL=https://datasheet.ciiva.com/8042/90386-8042363.pdf?src-supplier=Element14, ComponentLink9Description=https://datasheet.ciiva.com/5697/1558097-5697692.pdf?src-supplier=Farnell, ComponentLink9URL=https://datasheet.ciiva.com/5697/1558097-5697692.pdf?src-supplier=Farnell, Contact Plating=Tin,Matte, Height=1.6mm, Lead Free="Lead Free", Length=6.5mm, Manufacturer Part Number=LMS8117AMP-3.3/NOPB, Max Output Current=1A, Mount="Surface Mount", Number of Outputs=1, Number of Pins=4, Output Current=1A, Output Type=Fixed, Output Voltage=3.3V, Packaging="Tape and Reel", Polarity=Positive, Pricing 1="1=1.18760, 10=1.01800, 100=0.77540, 250=0.68460, 500=0.64870, 1000=0.59270 (USD)", Radiation Hardening=No, REACH SVHC="No SVHC", RoHS=Yes, RoHS Compliant=Yes, Stock 1=843, Supplier 1="Arrow Electronics", Supplier Part Number 1=LMS8117AMP-3.3/NOPB, Width=3.56mm
U3 U4: "SENSOR CURRENT HALL 20A DC", Case/Package=SOIC, Current Sensing=20A, Frequency=80kHz, MANUFACTURER="Allegro MicroSystems", Max Operating Temperature=150°C, Max Supply Current=14mA, Min Operating Temperature=-40°C, Supplier Part Number 1=620-1645-1-ND, Accuracy=3%, Category="Current Sensors", ComponentLink1Description=http://www.farnell.com/datasheets/2838158.pdf?src-supplier=Farnell, ComponentLink1URL=http://www.farnell.com/datasheets/2838158.pdf?src-supplier=Farnell, ComponentLink2Description=http://www.farnell.com/datasheets/2838158.pdf?src-supplier=Newark, ComponentLink2URL=http://www.farnell.com/datasheets/2838158.pdf?src-supplier=Newark, ComponentLink3Description=http://www.allegromicro.com/~/media/Files/Datasheets/ACS723-Datasheet.ashx?src-supplier=Digi-Key, ComponentLink3URL=http://www.allegromicro.com/~/media/Files/Datasheets/ACS723-Datasheet.ashx?src-supplier=Digi-Key, ComponentLink4Description=https://www.allegromicro.com/~/media/Files/Datasheets/ACS723-Datasheet.ashx?src-supplier=Digi-Key, ComponentLink4URL=https://www.allegromicro.com/~/media/Files/Datasheets/ACS723-Datasheet.ashx?src-supplier=Digi-Key, Linearity=1%, Manufacturer Part Number=ACS723LLCTR-20AU-T, Mount="Surface Mount", Number of Channels=1, Number of Pins=8, Packaging="Tape and Reel", Polarity=Unidirectional, Pricing 1="1=4.46000, 5=3.94000, 10=3.47900, 25=2.82280, 50=2.49480, 100=2.42900, 500=2.03516, 1000=1.90385 (USD)", Response Time=5us, RoHS=Yes, RoHS Compliant=Yes, Sensitivity=200mV/A, Supplier 1=Digi-Key
U5: "IC MCU 32BIT 64KB FLASH 64LQFP", Case/Package=LQFP, Frequency=48MHz, MANUFACTURER=STMicroelectronics, Max Operating Temperature=85°C, Max Power Dissipation=455mW, Max Supply Voltage=3.6V, Min Operating Temperature=-40°C, Min Supply Voltage=2V, Supplier Part Number 1=497-17361-ND, Category=Microcontrollers, ComponentLink1Description=https://datasheet.ciiva.com/48492/dm00090510-48492508.pdf?src-supplier=Avnet, ComponentLink1URL=https://datasheet.ciiva.com/48492/dm00090510-48492508.pdf?src-supplier=Avnet, Contact Plating=Tin,Matte, Core Architecture=ARM, Data Bus Width=32b, Interface=I2C,SPI,USB,CAN,HDMI,IrDA,UART,USART,LIN,I2S, Lead Free="Lead Free", Manufacturer Part Number=STM32F072R8T6, Max Frequency=48MHz, Memory Size=64KB, Memory Type=FLASH, Mount="Surface Mount", Number of I/Os=51, Number of Pins=64, Number of Programmable I/O=51, Number of Timers/Counters=9, Oscillator Type=Internal, Packaging=Tray, Peripherals=POR,PWM,WDT,DMA, Pricing 1="1=5.28000, 10=4.73900, 25=4.48040, 160=3.88300, 320=3.68388, 480=3.31879 (USD)", RAM Size=16KB, RoHS=Yes, RoHS Compliant=Yes, Supplier 1=Digi-Key, Watchdog Timer=Yes
U6: "IC GATE DRVR LOW-SIDE 8SOIC", Case/Package=SOIC, MANUFACTURER="ON Semiconductor", Max Operating Temperature=140°C, Max Output Current=5A, Max Supply Current=3mA, Max Supply Voltage=20V, Min Operating Temperature=-40°C, Min Supply Voltage=4.5V, Supplier Part Number 1=NCP81071ADR2GOSDKR-ND, Category="Gate Drivers", Channel Type=Independent, ComponentLink1Description=https://datasheet.ciiva.com/48511/ncp81071-d-48511319.pdf?src-supplier=Avnet, ComponentLink1URL=https://datasheet.ciiva.com/48511/ncp81071-d-48511319.pdf?src-supplier=Avnet, Height=1.5mm, Lead Free="Lead Free", Length=5mm, Manufacturer Part Number=NCP81071ADR2G, Mount="Surface Mount", Number of Drivers=2, Number of Outputs=2, Number of Pins=8, Packaging="Cut Tape", Pricing 1="1=1.40000, 10=1.25100, 25=1.18720, 100=0.97520, 250=0.91160, 500=0.80560, 1000=0.70000 (USD)", REACH SVHC="No SVHC", RoHS=Yes, RoHS Compliant=Yes, Supplier 1=Digi-Key, Width=4mm
X1: "CRYSTAL 8.0000MHZ 18PF SMD"

## Nets (pads, with @x,y where several pads share a name; then routed paths per layer and width w, separated by ;. In a path a pad name is that pad's centre, name@x,y a point inside that pad or via, vN(x,y) a via of type N, cw(c..) or ccw(c..) an arc to the next point about the centre after c; other vN are vias at no path point)
3V3: C7.1 C8.1 C27.1 C28.1 C50.1 C51.1 C52.1 J1.1 L1.1 LED1.1 LED2.1 LED3.1 P2.1 P11.2 R19.2 R20.2 R21.2 R22.2 R23.2 R24.2 R49.2 U2.2 U2.4 U5.1 U5.19 U5.32 U5.48 U5.64
5V: C4.1 C5.1 C11.1 C12.1 C24.1 C25.1 C45.1 C46.1 C47.1 C48.1 C49.1 D3.1 LS1.1 P6.1 P8.5 P12.2 Q11.2 R34.2 R35.2 R40.2 R41.2 R42.2 R48.2 R52.2 R53.1 SB5.1 U1.3 U3.8 U4.8
_ADC: C34.1 R14.2 R17.2 U5.14
BASE: Q9.1 Q10.3 R34.1
BAT: C3.2 P1.1 Q1.3 Q3.3 R1.1 SB1.2
BOOT0: R15.1 U5.60
CRNT_SNS.IP+_1: C13.1 C14.1 C16.1 C17.1 P4.1 R7.2 U3.1 U3.2
CRNT_SNS.IP+_2: C19.1 C20.1 C22.1 C23.1 P5.1 R10.2 U4.1 U4.2
DIV: P12.3 R53.2 R54.2
DRV_OUTA1: R30.2 U6.7
DRV_OUTB1: R31.2 U6.5
ENA: P9.13 R29.1 U5.53 U6.1 U6.8
GATE_DRV.INA_1: U5.16 U6.2
GATE_DRV.INB_1: U5.15 U6.4
GND: C1.2 C2.2 C3.1 C4.2 C5.2 C6.2 C7.2 C8.2 C9.2 C10.2 C11.2 C12.2 C13.2 C14.2 C15.2 C16.2 C17.2 C18.2 C19.2 C20.2 C21.2 C22.2 C23.2 C24.2 C25.2 C26.2 C27.2 C28.2 C29.2 C30.2 C31.1 C32.1 C33.2 C34.2 C35.1 C36.1 C37.1 C38.1 C39.1 C40.1 C41.2 C42.1 C43.2 C44.2 C45.2 C46.2 C47.2 C48.2 C49.2 C50.2 C51.2 C52.2 C53.2 D1.2 D2.2 D3.2 D4.2 D5.2 J1.3 J1.5 J1.9 P1.2 P2.3 P3.2 P6.3 P8.1 P10.4 P11.1 P12.1 P12.5 P12.7 P12.8 P12.9 P12.10 P13.6 Q2.2 Q3.2 Q5.2 Q6.2 Q7.2 Q8.2 Q9.2 Q10.2 Q12.2 Q13.2 Q14.2 Q15.2 Q16.2 Q17.2 R1.2 R7.1 R8.1 R10.1 R11.1 R17.1 R25.2 R29.2 R37.1 R39.2 R51.1 R54.1 R56.2 SW1.1 SW2.1 SW3.1 SW4.1 SW5.1 SW6.1 SW7.1 U1.2 U2.1 U3.5 U4.5 U5.12 U5.18 U5.31 U5.47 U5.63 U6.3
GND_DRV_1: P4.2 Q7.3
GND_DRV_2: P5.2 Q8.3
HEATER: C42.2 P3.1 Q4.3 Q6.3 R25.1 SB2.2
IO_A3: R55.2 U5.17
IO_A8: R13.1 SB3.1 U5.41
IO_A9: P7.4 R33.1 U5.42
IO_A10: P7.3 R32.1 U5.43
IO_A11: R16.1 U5.44
IO_A12: R18.1 U5.45
IO_B7: R4.1 U5.59
IO_B7#: Q2.1 Q3.1 R4.2
IO_B9: R38.1 U5.62
IO_B10: P12.4 U5.29
IO_B11: P12.6 U5.30
IO_B12: P12.11 U5.33
IO_B13: P12.12 U5.34
IO_B14: P12.13 U5.35
IO_B15: P12.14 U5.36
IO_C0: P9.1 U5.8
IO_C1: P9.2 U5.9
IO_C2: P9.3 U5.10
IO_C3: P9.4 U5.11
IO_C4: P9.5 R45.1 U5.24
IO_C5: P9.6 R36.2 U5.25
IO_C5#: D4.1 P8.3 Q12.3 R36.1 R40.1
IO_C6: P9.7 U5.37
IO_C7: P9.8 U5.38
IO_C8: P9.9 U5.39
IO_C9: P9.10 R28.1 U5.40
IO_C9#: Q5.1 Q6.1 R28.2
IO_C13: P9.14 R44.1 U5.2
MISO: P11.5 U5.22
MOSI: P11.3 U5.23
NetC15_1: C15.1 U3.6
NetC21_1: C21.1 U4.6
NetC32_2: C32.2 R12.2 X1.2
NetLED1_2: LED1.2 R13.2
NetLED2_2: LED2.2 R16.2
NetLED3_2: LED3.2 R18.2
NetLS1_2: LS1.2 Q17.3
NetP2_2: P2.2 R15.2
NetP8_4: P8.4 R37.2
NetP8_6: P8.6 R38.2
NetP10_1: P10.1 SB6.2
NetP10_2: P10.2 R48.1
NetP12_15: P12.15 R52.1
NetQ1_1: Q1.1 R2.1 R3.1
NetQ2_3: Q2.3 R3.2
NetQ4_1: Q4.1 R26.1 R27.1
NetQ5_3: Q5.3 R27.2
NetQ7_1: Q7.1 R30.1
NetQ8_1: Q8.1 R31.1
NetQ10_1: Q10.1 R32.2
NetQ11_1: Q11.1 R41.1 R43.1
NetQ12_1: Q12.1 Q14.3 R42.1
NetQ13_1: Q13.1 R44.2
NetQ13_3: Q13.3 R43.2
NetQ14_1: Q14.1 R45.2
NetQ15_1: Q15.1 R50.1
NetQ16_1: Q16.1 R55.1 R56.1
NetQ17_1: Q17.1 R58.1 SB3.2
NetR6_2: R6.2 U3.7
NetR9_2: R9.2 U4.7
NRST: C33.1 J1.10 SW1.3 U5.7
OSC_IN: P9.15 P11.7 U5.3
OSC_OUT: P9.16 P11.6 U5.4
PIN4: P8.2 Q11.3 R39.1
PS_MCU: C53.1 D5.1 P10.3 R50.2 R51.2
PWM_BCK: P12.16 Q16.3
PWM_D2: Q15.3 R49.1 U5.54
SPI_CLK: P11.4 U5.21
SPI_CS: P11.8 U5.20
SW_1: C35.2 R19.1 SW2.3 U5.55
SW_2: C36.2 R20.1 SW3.3 U5.28
SW_3: C37.2 R21.1 SW4.3 U5.56
SW_4: C38.2 R22.1 SW5.3 U5.57
SW_5: C39.2 R23.1 SW7.3 U5.58
SW_6: C40.2 R24.1 R58.2 SW6.3 U5.50
SWCLK: J1.4 U5.49
SWDIO: J1.2 U5.46
TEMP: P6.2 Q9.3 R33.2 R35.1
USART_RX: P9.12 P13.3 U5.52
USART_TX: P9.11 P13.2 U5.51
VCC: C1.1 C2.1 C6.1 C41.1 C43.1 C44.1 D1.1 Q1.2 Q4.2 R2.2 R5.2 R14.1 R26.2 SB1.1 SB2.1 SB5.2 SB6.1 U3.3 U3.4 U4.3 U4.4 U6.6
VCC#: C9.1 C10.1 D2.1 R5.1 U1.1 U2.3
VDDA: C29.1 C30.1 L1.2 U5.13
VIOUT_1: C18.1 R6.1 R8.2 U5.26
VIOUT_2: C26.1 R9.1 R11.2 U5.27
XIN: C31.2 U5.5 X1.1
XOUT: R12.1 U5.6
pads on no net: J1.6 J1.7 J1.8 P7.1 P7.2 P13.1 P13.4 P13.5 SW1.2 SW1.4 SW2.2 SW2.4 SW3.2 SW3.4 SW4.2 SW4.4 SW5.2 SW5.4 SW6.2 SW6.4 SW7.2 SW7.4 U5.61

## Silkscreen, mask and mechanical layers (free items; w line width, h text height)
Top Overlay:
  lines w8: 727,101 727,120